# Altium PCB Thunderscope_Rev5.3.PcbDoc (part 13 of 14)
Units mil, origin at the board's own origin, x right, y up, seen from the top; angles counter-clockwise.
Board outline 3937.01 x 3838.58 mil, 6 copper layers (F.Cu, In1.Cu (GND), In2.Cu (Sign), In3.Cu (Sign), In4.Cu (GND), B.Cu), stack 60.556 mil thick; 911 components, 486 nets, 2834 pads, 2761 vias.
Unrouted connection lines stored in the file: 618.
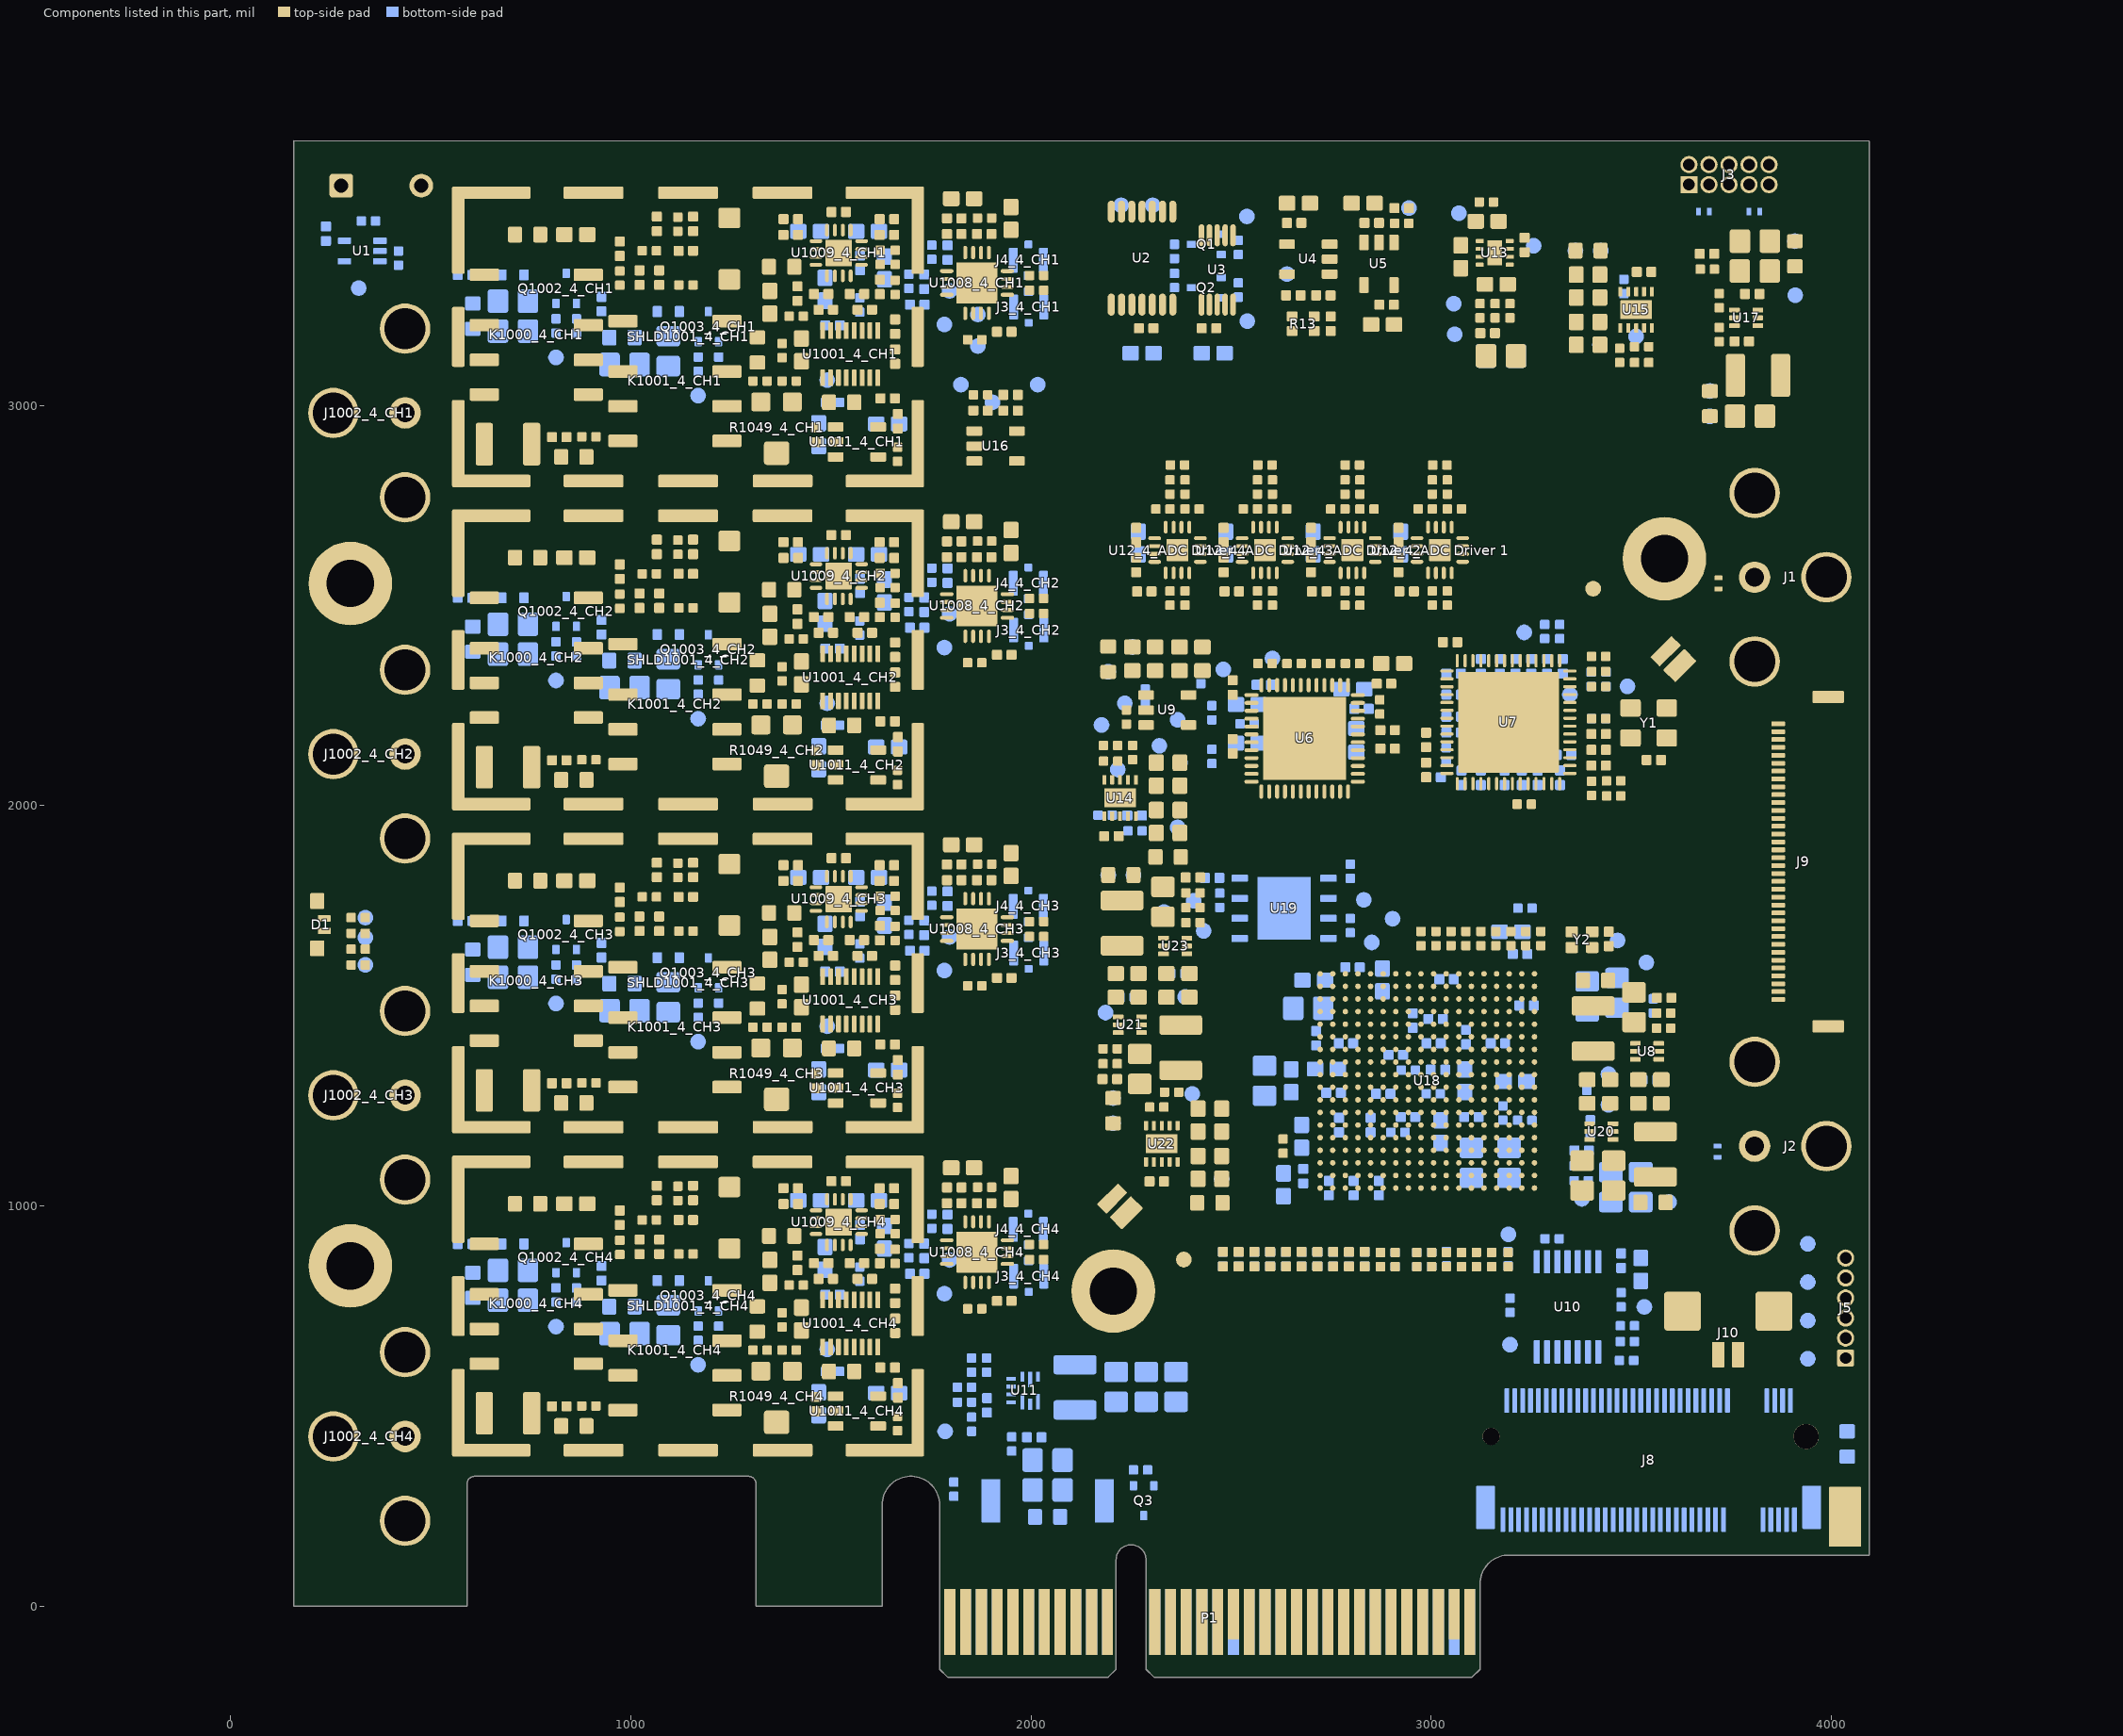
[diagram p16: the components of this part, seen from the top]

## Polygon pours and split planes (outlines as drawn) (continued)
+VUSB on B.Cu "B.Cu--86" (solid, remove dead copper, pour order 139): 2402,553.74 2402,455 2047.64,455 2047.64,483.61 2047.64,531.64 2069.74,553.74
+12V_PCIe_R on B.Cu "B.Cu--70" (solid, remove dead copper, pour order 140): 2037.4,188.98 2037.4,401.57 2007.87,401.57 2007.87,460 1973,460 1973,334.65 1868.11,334.65 1868.11,188.98 1972.44,188.98
+1V8APLL on B.Cu "B.Cu--97" (solid, remove dead copper, pour order 275): 3274.61,2353.94 3274.61,2402.95 3284.79,2402.95 3301.97,2385.78 3301.97,2353.94
+1V0 on B.Cu "B.Cu--22" (solid, remove dead copper, pour order 315): 34 vertices, not listed, extent 2849.41,1118.11 3224.41,1358.27
+3V3 on B.Cu "B.Cu--53" (solid, remove dead copper, pour order 304): 3156.5,1292.52 3156.5,1344.49 3135.83,1344.49 3135.83,1449.8 3162.4,1449.8 3162.4,1380.91 3172.24,1371.06 3201.77,1371.06 3201.77,1292.52
+3V3_ACQ on B.Cu "B.Cu--99" (solid, remove dead copper, pour order 287): 3319.34,2353.94 3296.26,2377.02 3296.26,2400.98 3315.3,2400.98 3341.34,2374.95 3341.34,2353.94
+3V3 on B.Cu "B.Cu--91" (solid, remove dead copper, pour order 284): 3269.68,1513.39 3269.68,1486.19 3279.53,1476.18 3279.53,1460.43 3243.7,1460.43 3243.7,1513.39
+1V8_ACQ on B.Cu "B.Cu--21" (solid, remove dead copper, pour order 266): 2464.57,2051.18 2360.24,2051.18 2277.56,2133.86 2277.56,2228.35 2464.57,2228.35
+1V8D on B.Cu "B.Cu--38" (solid, remove dead copper, pour order 218): 2438.98,2127.95 2438.98,2179.11 2532.26,2179.11 2532.26,2127.95
-5V on B.Cu "B.Cu--10" (solid, remove dead copper, pour order 146): 1465.75,1668.7 1465.75,1626.38 1498.77,1626.38 1509.25,1615.9 1509.25,1572.64 1550.21,1572.64 1550.2,1626.38 1550.2,1668.7
+1V0_R on B.Cu "B.Cu--25" (solid, remove dead copper, pour order 211): 3409.45,964.57 3336.61,964.57 3336.61,1151.57 3375.98,1151.57 3375.98,1043.31 3409.45,1043.31
+3V3 on B.Cu "B.Cu--26" (solid, remove dead copper, pour order 321): 3496.06,1633.86 3496.06,1532.28 3334.65,1532.28 3334.65,1586.61 3380.91,1633.86
+1V8 on B.Cu "B.Cu--31" (solid, remove dead copper, pour order 314): 2742.13,1324.8 2742.13,1369.09 2767.72,1369.09 2767.72,1323.82 2759.84,1315.94 2759.84,1297.24 2724.41,1297.24 2724.41,1250 2553.35,1250 2553.35,1324.8
+1V0 on B.Cu "B.Cu--81" (solid, remove dead copper, pour order 308): 3634.65,1036.22 3634.65,930.12 3413.58,930.12 3413.58,1036.22
+2V5 on B.Cu "B.Cu--5" (solid, remove dead copper, pour order 272): 2692.13,1582.68 2755.91,1582.68 2803.15,1582.68 2803.15,1615.16 2925.2,1615.16 2925.2,1582.68 2925.2,1537.4 2755.91,1537.4 2755.91,1424.8 2692.13,1424.8
-5V on B.Cu "B.Cu--87" (solid, remove dead copper, pour order 168): 3162.2,3093.11 3162.2,3231.82 3082.28,3231.82 3082.28,3093.11
+3V3 on B.Cu "B.Cu--79" (solid, remove dead copper, pour order 339): 3461.61,848.82 3461.61,910.81 3545.84,910.81 3545.84,848.82
+1V8 on B.Cu "B.Cu--15" (solid, remove dead copper, pour order 313): 2844.49,1369.09 2844.49,1324.21 2748.03,1324.21 2748.03,1369.09
+1V0_MGT on B.Cu "B.Cu--96" (solid, remove dead copper, pour order 309): 2910.43,1165.35 2910.43,1196.85 2844.49,1196.85 2844.49,1182.09 2788.39,1182.09 2788.39,1196.85 2751.97,1196.85 2751.97,1182.09 2657.48,1182.09 2657.48,1124.02 2756.89,1124.02 2887.8,1124.02 2887.8,1165.35
+1V0 on B.Cu "B.Cu--54" (solid, remove dead copper, pour order 307): 3064.17,1301.38 3064.17,1384.84 3127.76,1384.84 3127.76,1301.38
+1V2_MGT on B.Cu "B.Cu--33" (solid, remove dead copper, pour order 267): 2588.78,1105.51 2717.52,1105.51 2717.52,1080.31 2687.5,1080.31 2667.22,1080.31 2647.64,1061.02 2588.58,1061.02
+3V3_ACQ on B.Cu "B.Cu--41" (solid, remove dead copper, pour order 225): 2806.1,2250.05 2824.8,2230.37 2824.8,2209.65 2857.28,2209.65 2857.28,2229.33 2857.28,2331.69 2806.1,2331.69
+1V8A on B.Cu "B.Cu--66" (solid, remove dead copper, pour order 224): 2882.29,2211.81 2882.29,2174.23 2792.15,2174.23 2792.15,2211.81
+1V8A on B.Cu "B.Cu--17" (solid, remove dead copper, pour order 223): 2438.98,2234.06 2438.98,2288.37 2532.65,2288.37 2532.65,2234.06
+3V3 on B.Cu "B.Cu--79" (solid, remove dead copper, pour order 221): 3461.61,848.82 3461.61,910.81 3545.84,910.81 3545.84,848.82
+1V8D on B.Cu "B.Cu--12" (solid, remove dead copper, pour order 217): 2882.29,2164.37 2882.29,2115.18 2792.54,2115.18 2792.54,2164.37
+3V3_ACQ on B.Cu "B.Cu--93" (solid, remove dead copper, pour order 171): 2505.51,2607.28 2505.51,2658.66 2444.69,2658.66 2444.69,2623.57 2460.98,2607.28
-5V on B.Cu "B.Cu--90" (solid, remove dead copper, pour order 170): 1465.75,2475.79 1465.75,2433.46 1498.77,2433.46 1509.25,2422.98 1509.25,2379.72 1550.21,2379.72 1550.2,2433.46 1550.2,2475.79
+5V on B.Cu "B.Cu--88" (solid, remove dead copper, pour order 169): 1634.25,2217.32 1631.57,2220 1591.93,2220 1591.93,2120.87 1634.25,2120.87
+5V on B.Cu "B.Cu--85" (solid, remove dead copper, pour order 167): 1641.14,994.29 1598.82,994.29 1598.82,1028.28 1587.8,1039.36 1587.8,1078.74 1598.82,1078.74 1641.14,1078.74
+5V on B.Cu "B.Cu--84" (solid, remove dead copper, pour order 166): 1641.14,3415.55 1598.82,3415.55 1598.82,3449.54 1587.8,3460.62 1587.8,3500 1598.82,3500 1641.14,3500
+5V on B.Cu "B.Cu--82" (solid, remove dead copper, pour order 165): 1641.14,1801.38 1598.82,1801.38 1598.82,1835.37 1587.8,1846.44 1587.8,1885.83 1598.82,1885.83 1641.14,1885.83
-5V on B.Cu "B.Cu--80" (solid, remove dead copper, pour order 164): 1465.75,861.61 1465.75,819.29 1498.77,819.29 1509.25,808.81 1509.25,765.55 1550.21,765.55 1550.2,819.29 1550.2,861.61
+5V on B.Cu "B.Cu--76" (solid, remove dead copper, pour order 163): 1641.14,2608.46 1598.82,2608.46 1598.82,2642.46 1587.8,2653.53 1587.8,2692.91 1598.82,2692.91 1641.14,2692.91
-5V on B.Cu "B.Cu--74" (solid, remove dead copper, pour order 162): 1653.35,929.72 1653.35,972.05 1592.52,972.05 1587.01,966.54 1559.84,966.54 1559.84,939.96 1582.88,939.96 1592.91,929.72
-5V on B.Cu "B.Cu--72" (solid, remove dead copper, pour order 161): 1465.75,3282.87 1465.75,3240.55 1498.77,3240.55 1509.25,3230.07 1509.25,3186.81 1550.21,3186.81 1550.2,3240.55 1550.2,3282.87
-5V on B.Cu "B.Cu--71" (solid, remove dead copper, pour order 160): 1488.98,1263.39 1488.98,1305.71 1427.95,1305.71 1427.95,1263.39
-5V on B.Cu "B.Cu--67" (solid, remove dead copper, pour order 159): 1488.98,2877.56 1488.98,2919.88 1427.95,2919.88 1427.95,2877.56
-5V on B.Cu "B.Cu--63" (solid, remove dead copper, pour order 158): 1488.98,2070.47 1488.98,2112.8 1427.95,2112.8 1427.95,2070.47
+3V3_ACQ on B.Cu "B.Cu--61" (solid, remove dead copper, pour order 157): 2724.02,2607.28 2724.02,2658.66 2663.19,2658.66 2663.19,2623.57 2679.48,2607.28
-5V on B.Cu "B.Cu--59" (solid, remove dead copper, pour order 156): 1653.35,1736.81 1653.35,1779.13 1592.52,1779.13 1587.01,1773.62 1559.84,1773.62 1559.84,1747.05 1582.88,1747.05 1592.91,1736.81
+3V3_ACQ on B.Cu "B.Cu--52" (solid, remove dead copper, pour order 155): 2942.53,2607.28 2942.53,2658.66 2881.7,2658.66 2881.7,2623.57 2897.99,2607.28
+5V on B.Cu "B.Cu--46" (solid, remove dead copper, pour order 154): 1634.25,608.7 1591.93,608.7 1591.93,507.87 1634.25,507.87
-5V on B.Cu "B.Cu--40" (solid, remove dead copper, pour order 153): 1653.35,3350.98 1653.35,3393.31 1592.52,3393.31 1587.01,3387.8 1559.84,3387.8 1559.84,3361.22 1582.88,3361.22 1592.91,3350.98
+5V on B.Cu "B.Cu--37" (solid, remove dead copper, pour order 152): 1397.24,1801.38 1439.57,1801.38 1439.57,1834.4 1458.32,1853.15 1514.63,1853.15 1514.63,1885.85 1439.57,1885.83 1397.24,1885.83
+5V on B.Cu "B.Cu--32" (solid, remove dead copper, pour order 151): 1397.24,994.29 1439.57,994.29 1439.57,1027.31 1458.32,1046.06 1514.63,1046.06 1514.63,1078.76 1439.57,1078.74 1397.24,1078.74
+5V on B.Cu "B.Cu--30" (solid, remove dead copper, pour order 150): 2285.43,3111.81 2326.97,3111.81 2326.97,3207.04 2285.43,3207.04
+3V3_ACQ on B.Cu "B.Cu--27" (solid, remove dead copper, pour order 149): 2287.01,2607.28 2287.01,2658.66 2226.18,2658.66 2226.18,2623.57 2242.47,2607.28
+5V on B.Cu "B.Cu--16" (solid, remove dead copper, pour order 148): 1634.25,3025.83 1632.99,3027.09 1591.93,3027.09 1591.93,2924.02 1634.25,2924.02
-5V on B.Cu "B.Cu--13" (solid, remove dead copper, pour order 147): 1488.98,456.3 1488.98,498.62 1427.95,498.62 1427.95,456.3
+5V on B.Cu "B.Cu--9" (solid, remove dead copper, pour order 145): 1397.24,2608.46 1439.57,2608.46 1439.57,2641.49 1458.32,2660.24 1514.63,2660.24 1514.63,2692.94 1439.57,2692.91 1397.24,2692.91
+5V on B.Cu "B.Cu--8" (solid, remove dead copper, pour order 144): 1634.25,1405.12 1625.98,1413.39 1591.93,1413.39 1591.93,1311.02 1634.25,1311.02
+5V on B.Cu "B.Cu--7" (solid, remove dead copper, pour order 143): 2406.1,3111.81 2447.64,3111.81 2447.64,3208.21 2406.1,3208.21
-5V on B.Cu "B.Cu--2" (solid, remove dead copper, pour order 142): 1653.35,2543.9 1653.35,2586.22 1592.52,2586.22 1587.01,2580.71 1559.84,2580.71 1559.84,2554.13 1582.88,2554.13 1592.91,2543.9
+5V on B.Cu "B.Cu--1" (solid, remove dead copper, pour order 141): 1397.24,3415.55 1439.57,3415.55 1439.57,3448.57 1458.32,3467.32 1514.63,3467.32 1514.63,3500.02 1439.57,3500 1397.24,3500
+1V8APLL on B.Cu "B.Cu--18" (solid, remove dead copper, pour order 325): 3051.18,2132.87 3051.18,2237.2 3001.97,2237.2 3001.97,2132.87
+3V3 on B.Cu "B.Cu--11" (solid, remove dead copper, pour order 320): 2792.32,1429.13 2792.32,1384.84 2842.03,1384.84 2849.41,1377.46 2849.41,1363.19 2882.87,1363.19 2882.87,1429.13
+2V5 on B.Cu "B.Cu--89" (solid, remove dead copper, pour order 312): 2809.05,1319.88 2809.05,1269.69 2760.83,1269.69 2760.83,1319.88
+1V0 on B.Cu "B.Cu--36" (solid, remove dead copper, pour order 306): 3036.61,1419.09 3036.61,1363.19 3011.42,1363.19 3011.42,1419.09
+3V3 on B.Cu "B.Cu--44" (solid, remove dead copper, pour order 305): 3221.26,1648.43 3221.26,1588.58 3179.33,1588.58 3179.33,1648.43
+1V8 on B.Cu "B.Cu--28" (solid, remove dead copper, pour order 303): 3012.8,1480.31 3043.31,1480.31 3043.31,1453.74 3129.92,1453.74 3129.92,1427.17 3012.8,1427.17
+2V5 on B.Cu "B.Cu--43" (solid, remove dead copper, pour order 302): 2966.14,1462.99 2917.13,1462.99 2917.13,1494.09 2966.14,1494.09
+1V8APLL on B.Cu "B.Cu--19" (solid, remove dead copper, pour order 301): 3111.42,2353.94 3111.42,2402.95 3136.61,2402.95 3136.61,2353.94
+3V3_ACQ on B.Cu "B.Cu--3" (solid, remove dead copper, pour order 300): 3050.59,2317.13 3001.57,2317.13 3001.57,2349.21 3050.59,2349.21
+3V3_ACQ on B.Cu "B.Cu--77" (solid, remove dead copper, pour order 289): 3050.59,2264.96 3001.57,2264.96 3001.57,2290.16 3050.59,2290.16
+3V3_ACQ on B.Cu "B.Cu--45" (solid, remove dead copper, pour order 288): 3088.39,2064.37 3088.39,2015.35 3060.24,2015.35 3060.24,2064.37
+3V3_ACQ on B.Cu "B.Cu--35" (solid, remove dead copper, pour order 286): 3158.66,2353.94 3158.66,2402.95 3183.86,2402.95 3183.86,2353.94
+3V3_ACQ on B.Cu "B.Cu--42" (solid, remove dead copper, pour order 283): 3236.61,2353.94 3236.61,2379.72 3257.87,2400.98 3269.49,2400.98 3269.49,2363.39 3260.04,2353.94
+3V3_ACQ on B.Cu "B.Cu--69" (solid, remove dead copper, pour order 282): 3337.2,2139.57 3386.22,2139.57 3386.22,2109.25 3337.2,2109.25
+3V3_ACQ on B.Cu "B.Cu--78" (solid, remove dead copper, pour order 281): 3283.46,2064.37 3283.46,2015.35 3253.15,2015.35 3253.15,2064.37
+1V8APLL on B.Cu "B.Cu--60" (solid, remove dead copper, pour order 280): 3198.03,2353.94 3198.03,2402.95 3240.16,2402.95 3240.16,2353.94
+1V8APLL on B.Cu "B.Cu--92" (solid, remove dead copper, pour order 279): 3242.13,2064.37 3242.13,2015.35 3213.78,2015.35 3213.78,2064.37
+1V8APLL on B.Cu "B.Cu--24" (solid, remove dead copper, pour order 278): 3334.45,2064.37 3334.45,2015.35 3309.25,2015.35 3309.25,2064.37
+3V3_ACQ on B.Cu "B.Cu--34" (solid, remove dead copper, pour order 277): 3195.67,2064.37 3195.67,2015.35 3170.47,2015.35 3170.47,2064.37
+1V8APLL on B.Cu "B.Cu--49" (solid, remove dead copper, pour order 276): 3136.61,2064.37 3136.61,2015.35 3111.42,2015.35 3111.42,2064.37
+1V8_ACQ on B.Cu "B.Cu--57" (solid, remove dead copper, pour order 274): 3053.15,2031.5 3053.15,2121.06 3007.87,2121.06 3007.87,2058.07 3002.95,2053.15 2980.31,2053.15 2980.31,2031.5
+3V3 on B.Cu "B.Cu--4" (solid, remove dead copper, pour order 273): 3069.09,1579.53 3069.09,1523.62 3043.9,1523.62 3043.9,1579.53
+1V8 on B.Cu "B.Cu--47" (solid, remove dead copper, pour order 271): 2912.99,1327.95 2912.99,1418.31 2942.13,1418.31 2942.13,1327.95
+1V2_MGT on B.Cu "B.Cu--56" (solid, remove dead copper, pour order 269): 2731.5,1039.27 2844.49,1039.27 2844.49,1014.07 2731.5,1014.07
+1V2_MGT on B.Cu "B.Cu--95" (solid, remove dead copper, pour order 268): 2856.5,1075.49 2906.5,1075.49 2906.5,1050.3 2856.5,1050.3
NetC174_1 on B.Cu "B.Cu--39" (solid, remove dead copper, pour order 222): 3385.83,1159.45 3377.95,1151.57 3377.95,1045.28 3409.45,1045.28 3409.45,1192.32 3385.83,1192.32
NetC167_1 on B.Cu "B.Cu--29" (solid, remove dead copper, pour order 213): 3011.22,1353.15 3011.22,1326.77 2972.44,1326.77 2972.44,1303.15 2948.82,1303.15 2948.82,1353.35 3011.02,1353.35
AGND on B.Cu "B.Cu--75" (solid, remove dead copper, pour order 212): 2978.35,1321.36 3011.69,1321.36 3021.65,1331.32 3021.65,1353.15 3048.23,1353.15 3048.23,1330.33 3035.43,1318.52 3035.43,1269.19 3010.83,1269.19 3010.83,1295.52 3002.71,1303.64 2978.35,1303.64
PGA_BIAS_CH2 on B.Cu "B.Cu--98" (solid, remove dead copper, pour order 210): 1681.1,2506.89 1681.1,2569.88 1748.03,2569.88 1764.76,2569.88 1764.76,2549.46 1748.03,2532.48 1748.03,2506.89
PGA_BIAS_CH4 on B.Cu "B.Cu--94" (solid, remove dead copper, pour order 209): 1681.1,892.72 1681.1,955.71 1748.03,955.71 1764.76,955.71 1764.76,935.29 1748.03,918.31 1748.03,892.72
TRIM_1 on B.Cu "B.Cu--83" (solid, remove dead copper, pour order 208): 1681.1,3307.09 1710.63,3307.09 1710.63,3239.17 1681.1,3239.17
TRIM_3 on B.Cu "B.Cu--65" (solid, remove dead copper, pour order 207): 1681.1,1692.91 1710.63,1692.91 1710.63,1625 1681.1,1625
PGA_BIAS_CH1 on B.Cu "B.Cu--58" (solid, remove dead copper, pour order 206): 1681.1,3313.98 1681.1,3376.97 1748.03,3376.97 1764.76,3376.97 1764.76,3356.55 1748.03,3339.57 1748.03,3313.98
TRIM_2 on B.Cu "B.Cu--51" (solid, remove dead copper, pour order 205): 1681.1,2500 1710.63,2500 1710.63,2432.09 1681.1,2432.09
TRIM_4 on B.Cu "B.Cu--48" (solid, remove dead copper, pour order 204): 1681.1,885.83 1710.63,885.83 1710.63,817.91 1681.1,817.91
PGA_BIAS_CH3 on B.Cu "B.Cu--23" (solid, remove dead copper, pour order 203): 1681.1,1699.8 1681.1,1762.8 1748.03,1762.8 1764.76,1762.8 1764.76,1742.37 1748.03,1725.39 1748.03,1699.8
+VBIAS on B.Cu "B.Cu--73" (solid, remove dead copper, pour order 188): 1675.59,3412.79 1803.94,3412.79 1803.94,3382.48 1675.59,3382.48
+VBIAS on B.Cu "B.Cu--68" (solid, remove dead copper, pour order 187): 1675.59,991.54 1803.94,991.54 1803.94,966.14 1675.59,966.14
+VBIAS on B.Cu "B.Cu--62" (solid, remove dead copper, pour order 186): 1675.59,1798.62 1803.94,1798.62 1803.94,1773.23 1675.59,1773.23
+VBIAS on B.Cu "B.Cu--6" (solid, remove dead copper, pour order 185): 1675.59,2605.71 1803.94,2605.71 1803.94,2580.32 1675.59,2580.32
+12V_PCIe on B.Cu "B.Cu--55" (solid, remove dead copper, pour order 202): 1889.76,49.21 1889.76,76.77 1931.1,118.11 2185.04,118.11 2185.04,157.48 2216.54,188.98 2216.54,338.58 2149.61,338.58 2149.61,251.97 2043.31,251.97 2043.31,188.98 1822.83,188.98 1822.83,49.21
+VUSB_M2 on B.Cu "B.Cu--14" (solid, remove dead copper, pour order 189): 3169.29,180.93 3980.14,180.93 3996.06,196.85 3996.06,391.73 4070.87,391.73 4070.87,272.64 4070.87,131.89 3169.29,131.89
GND on B.Cu "B.Cu--20" (solid, remove dead copper, pour order 270): 3000,1293.31 3000,1240.35 2974.8,1240.35 2974.8,1293.31
+VUSB on B.Cu "+VUSB_L06_P330" (solid, remove dead copper, pour order 330): 3996,536 4071,536 4071,415.91 3996,415.91
+3V3 on B.Cu "B.Cu--50" (solid, remove dead copper, pour order 285): 3162.99,1603.15 3162.99,1554.13 3137.8,1554.13 3137.8,1603.15
GND on In3.Cu (Sign) "In3.Cu-" (solid, remove dead copper, pour order 334): 0,3641.73 4094.49,3641.73 4094.49,-255.91 0,-255.91
+3V3_PGA on In3.Cu (Sign) "In3.Cu--13" (solid, remove dead copper, pour order 192): 24 vertices, not listed, extent 193.32,287.4 1988.19,3428.61
+1V0 on In3.Cu (Sign) "In3.Cu--2" (solid, remove dead copper, pour order 327): 2853.94,1397.64 3149.61,1397.64 3503.94,1043.31 3622.05,1043.31 3622.05,885.83 3243.11,885.83 3243.11,946.91 3128.29,1061.85 2999.02,1061.97 2999.02,1126.72 2961.37,1164.37 2853.94,1164.37
+3V3_PGA on In3.Cu (Sign) "In3.Cu--6" (solid, remove dead copper, pour order 195): 1998.03,3129.92 1998.03,3277.56 2052.17,3277.56 2052.17,3139.76 2561.02,3139.76 2561.02,3435.04 2506.11,3435.04 2506.11,3194.88 2261.81,3194.88 2043.31,3413.39 1899.61,3413.39 1899.61,3188.98 1899.61,3129.92
+VBIAS on In3.Cu (Sign) "In3.Cu--5" (solid, remove dead copper, pour order 196): 1785.72,3431.72 1909.92,3431.72 1965.4,3487.2 2603.35,3487.2 2603.35,3314.89 2669.29,3314.89 2669.29,3527.56 2648.62,3548.23 1674.24,3548.23 1674.24,954.72 1702.76,954.72 1702.76,3348.76
-5V on In3.Cu (Sign) "In3.Cu--12" (solid, remove dead copper, pour order 243): 3129.91,3151.05 3150.04,3151.05 3150.04,3098.43 2692.91,3098.43 2692.91,3523.62 2663.39,3553.15 1669.29,3553.15 1669.29,408.46 1399.61,408.46 1399.61,3641.73 3129.93,3641.73
VCM on In3.Cu (Sign) "In3.Cu--9" (solid, remove dead copper, pour order 324): 2191.93,2551.18 2191.93,2334.65 2448.82,2334.65 2448.82,2480.32 2992.13,2480.32 2992.13,2551.18
+3V3_ACQ on In3.Cu (Sign) "In3.Cu--7" (solid, remove dead copper, pour order 190): 19 vertices, not listed, extent 2191.93,2440.94 3133.86,2720.47
+3V3_PGA on In3.Cu (Sign) "In3.Cu--11" (solid, remove dead copper, pour order 193): 1899.61,3120.08 1921.26,3098.43 1921.26,2409.45 1899.61,2387.8 1899.61,2338.58 1988.19,2338.58 1988.19,3203.74 1899.61,3203.74
VCM on In3.Cu (Sign) "In3.Cu--3" (solid, remove dead copper, pour order 191): 23 vertices, not listed, extent 1968.5,724.41 2580,3277.56
+3V3_PGA on In3.Cu (Sign) "In3.Cu--8" (solid, remove dead copper, pour order 194): 1899.61,2312.99 1921.26,2291.34 1921.26,1602.36 1899.61,1580.71 1899.61,1531.5 1988.19,1531.5 1988.19,2362.2 1899.61,2362.2
+1V8D on In3.Cu (Sign) "In3.Cu--4" (solid, remove dead copper, pour order 245): 2885.17,2200.79 2449.8,2200.79 2449.8,2007.87 2761.81,2007.87 2885.17,2131.23
+3V3_ACQ on In3.Cu (Sign) "In3.Cu--10" (solid, remove dead copper, pour order 311): 2866.14,2206.69 2580.71,2206.69 2580.71,2360.24 2410,2360.24 2410,2477.36 3344.49,2477.36 3484.25,2337.6 3484.25,2007.87 3059.05,2007.87 3059.05,2051.18 3035.43,2074.8 2895.67,2074.8 2866.14,2104.33
+1V0_MGT on In3.Cu (Sign) "In3.Cu--1" (solid, remove dead copper, pour order 329): 2755.91,1169.29 2874.02,1169.29 2874.02,1141.73 2755.91,1141.73
+VUSB on In2.Cu (Sign) "In2.Cu--8" (solid, remove dead copper, pour order 331): 27 vertices, not listed, extent 305.12,255.91 4094.49,3641.73
+5V on In2.Cu (Sign) "In2.Cu--2" (solid, remove dead copper, pour order 319): 1787,645.47 1787,408.46 1399.61,408.46 1399.61,3641.73 2056.68,3641.73 3490,3641.73 3490,3055.12 2056.68,3055.12 2056.68,645.47
GND on In2.Cu (Sign) "In2.Cu--11" (solid, remove dead copper, pour order 335): -0.98,330.71 -0.98,3641.73 1395.09,3641.73 1394.88,407.48 1790.35,407.48 1790.35,336.61 1703.74,336.61 1703.74,19.69 -0.98,19.69
+3V3 on In2.Cu (Sign) "In2.Cu--3" (solid, remove dead copper, pour order 317): 18 vertices, not listed, extent 2322.07,866.14 3680,1988.19
-VBIAS on In2.Cu (Sign) "In2.Cu--7" (solid, remove dead copper, pour order 318): 1638.58,3582.68 1704.72,3582.68 2972.44,3582.68 2972.44,3480.86 2921.26,3480.86 2921.26,3543.31 2909.45,3555.12 1704.72,3555.12 1704.72,787.4 1638.58,787.4
GND on In2.Cu (Sign) "In2.Cu-" (solid, remove dead copper, pour order 333): 1704.72,324.8 4094.49,324.8 4094.49,-255.91 1704.72,-255.91
+1V8 on In2.Cu (Sign) "In2.Cu--10" (solid, remove dead copper, pour order 316): 23 vertices, not listed, extent 2145.67,962.6 3125.98,1447.87
+1V8APLL on In2.Cu (Sign) "In2.Cu--1" (solid, remove dead copper, pour order 263): 2905.51,2405.51 3582.68,2405.51 3582.68,1996.06 2905.51,1996.06
+2V5 on In2.Cu (Sign) "In2.Cu--6" (solid, remove dead copper, pour order 264): 21 vertices, not listed, extent 2145.67,1259.84 2947.48,1988.19
+1V2_MGT on In2.Cu (Sign) "In2.Cu--4" (solid, remove dead copper, pour order 265): 2917.32,1011.81 2440.94,1011.81 2370.08,1082.68 2370.08,1295.28 2540.35,1295.28 2540.35,1114.17 2917.32,1114.17
+1V8_ACQ on In2.Cu (Sign) "In2.Cu--9" (solid, pour order 138): 2341.76,1996.06 2341.76,2177.17 2996.06,2177.17 2996.06,2153.54 3059.05,2153.54 3059.05,1996.06
+1V8A on In2.Cu (Sign) "In2.Cu--5" (solid, remove dead copper, pour order 137): 2905.51,2405.51 2905.51,2181.1 2464.57,2181.1 2464.57,2405.51
GND on In1.Cu (GND) "In1.Cu-" (solid, remove dead copper, pour order 332): 0,3641.73 4094.49,3641.73 4094.49,-255.91 0,-255.91
GND on In4.Cu (GND) "In4.Cu-" (solid, remove dead copper, pour order 336): 0,3641.73 4094.49,3641.73 4094.49,-255.91 0,-255.91

## Keep-outs
F.Cu:
  circle w39.37: c3404.53,2542.32 r19.68
  circle w39.37: c2381.89,866.14 r19.68
  rectangle: 3637.2,2029.44 3740.04,2123.74
  rectangle: 3740.16,1507.87 3851.87,2212.6
  region: 1772.76,239.09 589.53,239.09 589.53,366.16 1772.76,366.16
  region: 2616.99,2727.16 2552.03,2727.16 2552.03,2865.35 2616.99,2865.35
  region: 2398.49,2727.16 2333.53,2727.16 2333.53,2865.35 2398.49,2865.35
  region: 3054.01,2727.16 2989.05,2727.16 2989.05,2865.35 3054.01,2865.35
  region: 2433.86,2727.16 2297.64,2727.16 2297.64,2755.14 2433.86,2755.14
  region: 2835.5,2727.16 2770.54,2727.16 2770.54,2865.35 2835.5,2865.35
  region: 3089.38,2727.16 2953.16,2727.16 2953.16,2755.14 3089.38,2755.14
  region: 2652.36,2727.16 2516.15,2727.16 2516.15,2755.14 2652.36,2755.14
  region: 2870.87,2727.16 2734.65,2727.16 2734.65,2755.14 2870.87,2755.14
  region: 1627.95,4.92 1312.99,4.92 1312.99,135.83 1627.95,135.83
  region: 2925.2,2083.42 2925.2,1267.72 2507.87,1267.72 2507.87,1302.36 2440.94,1302.36 2440.94,2064.96 2475.39,2099.41 2909.2,2099.41
  region: 2833.66,2321.85 2833.66,2016.74 2534.18,2016.74 2534.18,2321.85
  region: 3437.99,2061.02 3400.59,2061.02 3400.59,2100.39 3400.59,2375.59 3434.83,2375.59
  region: 2884.84,795.28 2539.37,795.28 2539.37,866.56 2614.15,941.34 2884.84,941.34
  region: 3804.68,1625.98 2926.18,1625.98 2926.18,2028.54 3804.68,2028.54
  region: 3362.75,2379.13 3362.75,2038.77 3023.9,2038.77 3023.9,2379.13
  region: 3305.12,997.54 2675.2,997.54 2675.2,1627.46 3305.12,1627.46
  lines w10: 3670.38,1555.05 3712.23,1513.2 3746.64,1513.2
In1.Cu (GND):
  region: 1772.76,239.09 589.53,239.09 589.53,366.16 1772.76,366.16
  region: 1035.63,473.62 960.63,473.62 960.63,506.69 1035.63,506.69
  region: 1036.24,865.35 1007.08,865.35 1007.08,930.71 1036.24,930.71
  region: 692.91,2274.31 617.91,2274.31 617.91,2307.38 692.91,2307.38
  region: 906.32,2101.97 845.67,2101.97 845.67,2127.56 906.32,2127.56
  region: 1079.54,3421.06 1050.39,3421.06 1050.39,3450.2 1079.54,3450.2
  region: 1269.49,2261.02 1194.49,2261.02 1194.49,2294.09 1269.49,2294.09
  region: 906.32,1294.88 845.67,1294.88 845.67,1320.47 906.32,1320.47
  region: 692.91,3168.01 617.91,3168.01 617.91,3201.08 692.91,3201.08
  region: 692.91,573.52 617.91,573.52 617.91,606.59 692.91,606.59
  region: 1170.08,2564.76 1104.72,2564.76 1104.72,2593.91 1170.08,2593.91
  region: 1077.76,3400.2 1077.76,3372.64 1014.78,3372.64 1014.78,3400.2
  region: 986.22,865.16 958.66,865.16 958.66,928.13 986.22,928.13
  region: 792.72,969.88 691.93,969.88 691.93,1011.61 792.72,1011.61
  region: 1036.24,1672.44 1007.08,1672.44 1007.08,1737.8 1036.24,1737.8
  region: 987.02,937.8 957.87,937.8 957.87,966.93 987.02,966.93
  region: 692.91,2994.78 617.91,2994.78 617.91,3027.85 692.91,3027.85
  region: 1364.96,903.74 1325.98,903.74 1325.98,946.66 1364.96,946.66
  region: 1269.49,1367.32 1194.49,1367.32 1194.49,1400.39 1269.49,1400.39
  region: 986.22,1672.24 958.66,1672.24 958.66,1735.22 986.22,1735.22
  region: 888.57,2851.08 788.57,2851.08 788.57,2892.03 888.57,2892.03
  region: 1169.29,3314.96 1169.29,3287.4 1106.32,3287.4 1106.32,3314.96
  region: 1085.45,865.35 1056.29,865.35 1056.29,930.71 1085.45,930.71
  region: 926.77,1380.61 851.77,1380.61 851.77,1413.68 926.77,1413.68
  region: 833.85,486.02 770.67,486.02 770.67,513.19 833.85,513.19
  region: 1269.49,1453.94 1194.49,1453.94 1194.49,1487.01 1269.49,1487.01
  region: 1035.63,2174.41 960.63,2174.41 960.63,2207.48 1035.63,2207.48
  region: 757.68,479.79 667.52,479.79 667.52,511.37 757.68,511.37
  region: 757.68,2093.96 667.52,2093.96 667.52,2125.54 757.68,2125.54
  region: 1035.63,560.24 960.63,560.24 960.63,593.31 1035.63,593.31
  region: 1131.11,1807.09 1103.54,1807.09 1103.54,1834.65 1131.11,1834.65
  region: 792.72,2584.05 691.93,2584.05 691.93,2625.79 792.72,2625.79
  region: 1318.11,626.87 1292.33,626.87 1292.33,652.46 1318.11,652.46
  region: 852.17,970.18 813.19,970.18 813.19,1013.1 852.17,1013.1
  region: 1035.63,3068.11 960.63,3068.11 960.63,3101.18 1035.63,3101.18
  region: 1035.63,1367.32 960.63,1367.32 960.63,1400.39 1035.63,1400.39
  region: 1035.63,1280.71 960.63,1280.71 960.63,1313.78 1035.63,1313.78
  region: 1269.49,1280.71 1194.49,1280.71 1194.49,1313.78 1269.49,1313.78
  region: 1085.45,2479.53 1056.29,2479.53 1056.29,2544.89 1085.45,2544.89
  region: 757.68,2901.05 667.52,2901.05 667.52,2932.63 757.68,2932.63
  region: 926.77,573.52 851.77,573.52 851.77,606.59 926.77,606.59
  region: 888.57,429.82 788.57,429.82 788.57,470.77 888.57,470.77
  region: 1366.93,786.22 1327.95,786.22 1327.95,887.01 1366.93,887.01
  region: 852.17,1777.27 813.19,1777.27 813.19,1820.18 852.17,1820.18
  region: 692.91,746.75 617.91,746.75 617.91,779.82 692.91,779.82
  region: 757.68,1286.87 667.52,1286.87 667.52,1318.46 757.68,1318.46
  region: 926.77,746.75 851.77,746.75 851.77,779.82 926.77,779.82
  region: 1364.96,3325 1325.98,3325 1325.98,3367.92 1364.96,3367.92
  region: 1170.08,950.58 1104.72,950.58 1104.72,979.74 1170.08,979.74
  region: 1085.45,3286.61 1056.29,3286.61 1056.29,3351.97 1085.45,3351.97
  region: 906.32,487.8 845.67,487.8 845.67,513.39 906.32,513.39
  region: 1035.63,646.85 960.63,646.85 960.63,679.92 1035.63,679.92
  region: 926.77,3168.01 851.77,3168.01 851.77,3201.08 926.77,3201.08
  region: 926.77,1553.84 851.77,1553.84 851.77,1586.91 926.77,1586.91
  region: 833.85,2907.28 770.67,2907.28 770.67,2934.45 833.85,2934.45
  region: 692.91,1553.84 617.91,1553.84 617.91,1586.91 692.91,1586.91
  region: 1035.63,2894.88 960.63,2894.88 960.63,2927.95 1035.63,2927.95
  region: 1131.11,1000 1103.54,1000 1103.54,1027.57 1131.11,1027.57
  region: 1366.93,2400.39 1327.95,2400.39 1327.95,2501.19 1366.93,2501.19
  region: 1169.29,2480.32 1106.32,2480.32 1106.32,2507.87 1169.29,2507.87
  region: 1364.96,1710.83 1325.98,1710.83 1325.98,1753.75 1364.96,1753.75
  region: 1269.49,646.85 1194.49,646.85 1194.49,679.92 1269.49,679.92
  region: 1275.59,3440.94 1216.54,3440.94 1216.54,3496.06 1275.59,3496.06
  region: 692.91,1467.22 617.91,1467.22 617.91,1500.3 692.91,1500.3
  region: 1035.63,2981.5 960.63,2981.5 960.63,3014.57 1035.63,3014.57
  region: 1336.71,667.32 1294.98,667.32 1294.98,768.11 1336.71,768.11
  region: 906.32,2909.06 845.67,2909.06 845.67,2934.65 906.32,2934.65
  region: 792.72,1776.97 691.93,1776.97 691.93,1818.7 792.72,1818.7
  region: 1035.63,2087.8 960.63,2087.8 960.63,2120.87 1035.63,2120.87
  region: 1036.24,2479.53 1007.08,2479.53 1007.08,2544.89 1036.24,2544.89
  region: 692.91,660.14 617.91,660.14 617.91,693.21 692.91,693.21
  region: 987.02,1744.88 957.87,1744.88 957.87,1774.02 987.02,1774.02
  region: 1170.1,1806.89 1140.94,1806.89 1140.94,1836.02 1170.1,1836.02
  region: 1269.49,473.62 1194.49,473.62 1194.49,506.69 1269.49,506.69
  region: 1269.49,3068.11 1194.49,3068.11 1194.49,3101.18 1269.49,3101.18
  region: 1077.76,1786.02 1077.76,1758.46 1014.78,1758.46 1014.78,1786.02
  region: 1275.59,2633.86 1216.54,2633.86 1216.54,2688.98 1275.59,2688.98
  region: 986.22,2479.33 958.66,2479.33 958.66,2542.3 986.22,2542.3
  region: 1035.63,2261.02 960.63,2261.02 960.63,2294.09 1035.63,2294.09
  region: 1269.49,560.24 1194.49,560.24 1194.49,593.31 1269.49,593.31
  region: 1269.49,2894.88 1194.49,2894.88 1194.49,2927.95 1269.49,2927.95
  region: 1085.45,1672.44 1056.29,1672.44 1056.29,1737.8 1085.45,1737.8
  region: 1131.11,3421.26 1103.54,3421.26 1103.54,3448.83 1131.11,3448.83
  region: 1318.11,2241.04 1292.33,2241.04 1292.33,2266.63 1318.11,2266.63
  region: 926.77,2274.31 851.77,2274.31 851.77,2307.38 926.77,2307.38
  region: 1079.54,1806.89 1050.39,1806.89 1050.39,1836.02 1079.54,1836.02
  region: 833.85,1293.11 770.67,1293.11 770.67,1320.28 833.85,1320.28
  region: 1275.59,1826.77 1216.54,1826.77 1216.54,1881.89 1275.59,1881.89
  region: 1336.71,1474.41 1294.98,1474.41 1294.98,1575.2 1336.71,1575.2
  region: 926.77,2360.93 851.77,2360.93 851.77,2394 926.77,2394
  region: 1169.29,1673.23 1106.32,1673.23 1106.32,1700.79 1169.29,1700.79
  region: 692.91,3081.4 617.91,3081.4 617.91,3114.47 692.91,3114.47
  region: 926.77,2994.78 851.77,2994.78 851.77,3027.85 926.77,3027.85
  region: 1366.93,1593.31 1327.95,1593.31 1327.95,1694.1 1366.93,1694.1
  region: 1170.08,3371.84 1104.72,3371.84 1104.72,3401 1170.08,3401
  region: 888.57,2043.99 788.57,2043.99 788.57,2084.94 888.57,2084.94
  region: 1035.63,1453.94 960.63,1453.94 960.63,1487.01 1035.63,1487.01
  region: 1366.93,3207.48 1327.95,3207.48 1327.95,3308.27 1366.93,3308.27
  region: 1318.11,1433.96 1292.33,1433.96 1292.33,1459.55 1318.11,1459.55
  region: 1364.96,2517.91 1325.98,2517.91 1325.98,2560.83 1364.96,2560.83
  region: 692.91,1380.61 617.91,1380.61 617.91,1413.68 692.91,1413.68
  region: 1079.54,999.8 1050.39,999.8 1050.39,1028.94 1079.54,1028.94
  region: 1131.11,2614.18 1103.54,2614.18 1103.54,2641.74 1131.11,2641.74
  region: 1079.54,2613.98 1050.39,2613.98 1050.39,2643.11 1079.54,2643.11
  region: 1077.76,2593.11 1077.76,2565.55 1014.78,2565.55 1014.78,2593.11
  region: 1170.1,3421.06 1140.94,3421.06 1140.94,3450.2 1170.1,3450.2
  region: 986.22,3286.42 958.66,3286.42 958.66,3349.39 986.22,3349.39
  region: 1170.1,999.8 1140.94,999.8 1140.94,1028.94 1170.1,1028.94
  region: 1336.71,3088.58 1294.98,3088.58 1294.98,3189.37 1336.71,3189.37
  region: 926.77,3081.4 851.77,3081.4 851.77,3114.47 926.77,3114.47
  region: 926.77,660.14 851.77,660.14 851.77,693.21 926.77,693.21
  region: 1269.49,2087.8 1194.49,2087.8 1194.49,2120.87 1269.49,2120.87
  region: 888.57,1236.91 788.57,1236.91 788.57,1277.85 888.57,1277.85
  region: 1170.1,2613.98 1140.94,2613.98 1140.94,2643.11 1170.1,2643.11
  region: 833.85,2100.2 770.67,2100.2 770.67,2127.36 833.85,2127.36
  region: 852.17,3391.44 813.19,3391.44 813.19,3434.36 852.17,3434.36
  region: 987.02,2551.97 957.87,2551.97 957.87,2581.1 987.02,2581.1
  region: 1318.11,3048.13 1292.33,3048.13 1292.33,3073.72 1318.11,3073.72
  region: 1169.29,866.14 1106.32,866.14 1106.32,893.7 1169.29,893.7
  region: 1077.76,951.38 1014.78,951.38 1014.78,978.94 1077.76,978.94
  region: 792.72,3391.14 691.93,3391.14 691.93,3432.87 792.72,3432.87
  region: 1269.49,2981.5 1194.49,2981.5 1194.49,3014.57 1269.49,3014.57
  region: 692.91,2360.93 617.91,2360.93 617.91,2394 692.91,2394
  region: 1036.24,3286.61 1007.08,3286.61 1007.08,3351.97 1036.24,3351.97
  region: 852.17,2584.35 813.19,2584.35 813.19,2627.27 852.17,2627.27
  region: 1275.59,1019.69 1216.54,1019.69 1216.54,1074.8 1275.59,1074.8
  region: 692.91,2187.7 617.91,2187.7 617.91,2220.77 692.91,2220.77
  region: 926.77,2187.7 851.77,2187.7 851.77,2220.77 926.77,2220.77
  region: 987.02,3359.06 957.87,3359.06 957.87,3388.19 987.02,3388.19
  region: 926.77,1467.22 851.77,1467.22 851.77,1500.3 926.77,1500.3
  region: 1269.49,2174.41 1194.49,2174.41 1194.49,2207.48 1269.49,2207.48
  region: 1336.71,2281.5 1294.98,2281.5 1294.98,2382.28 1336.71,2382.28
  region: 1170.08,1757.67 1104.72,1757.67 1104.72,1786.83 1170.08,1786.83
  region: 3122.05,-177.17 1771.65,-177.17 1771.65,43.31 3122.05,43.31
  region: 2616.99,2727.16 2552.03,2727.16 2552.03,2865.35 2616.99,2865.35
  region: 2398.49,2727.16 2333.53,2727.16 2333.53,2865.35 2398.49,2865.35
  region: 3054.01,2727.16 2989.05,2727.16 2989.05,2865.35 3054.01,2865.35
  region: 2433.86,2727.16 2297.64,2727.16 2297.64,2755.14 2433.86,2755.14
  region: 2835.5,2727.16 2770.54,2727.16 2770.54,2865.35 2835.5,2865.35
  region: 3089.38,2727.16 2953.16,2727.16 2953.16,2755.14 3089.38,2755.14
  region: 2652.36,2727.16 2516.15,2727.16 2516.15,2755.14 2652.36,2755.14
  region: 2870.87,2727.16 2734.65,2727.16 2734.65,2755.14 2870.87,2755.14
  region: 3122.05,-177.17 1771.65,-177.17 1771.65,43.31 3122.05,43.31
In2.Cu (Sign):
  region: 1772.76,239.09 590.55,239.09 590.55,324.8 1772.76,324.8
  region: 3122.05,-177.17 1771.65,-177.17 1771.65,43.31 3122.05,43.31
  region: 1035.63,473.62 960.63,473.62 960.63,506.69 1035.63,506.69
  region: 1036.24,865.35 1007.08,865.35 1007.08,930.71 1036.24,930.71
  region: 692.91,2274.31 617.91,2274.31 617.91,2307.38 692.91,2307.38
  region: 906.32,2101.97 845.67,2101.97 845.67,2127.56 906.32,2127.56
  region: 1079.54,3421.06 1050.39,3421.06 1050.39,3450.2 1079.54,3450.2
  region: 1269.49,2261.02 1194.49,2261.02 1194.49,2294.09 1269.49,2294.09
  region: 906.32,1294.88 845.67,1294.88 845.67,1320.47 906.32,1320.47
  region: 692.91,3168.01 617.91,3168.01 617.91,3201.08 692.91,3201.08
  region: 692.91,573.52 617.91,573.52 617.91,606.59 692.91,606.59
  region: 1170.08,2564.76 1104.72,2564.76 1104.72,2593.91 1170.08,2593.91
  region: 1077.76,3400.2 1077.76,3372.64 1014.78,3372.64 1014.78,3400.2
  region: 986.22,865.16 958.66,865.16 958.66,928.13 986.22,928.13
  region: 792.72,969.88 691.93,969.88 691.93,1011.61 792.72,1011.61
  region: 1036.24,1672.44 1007.08,1672.44 1007.08,1737.8 1036.24,1737.8
  region: 987.02,937.8 957.87,937.8 957.87,966.93 987.02,966.93
  region: 692.91,2994.78 617.91,2994.78 617.91,3027.85 692.91,3027.85
  region: 1364.96,903.74 1325.98,903.74 1325.98,946.66 1364.96,946.66
  region: 1269.49,1367.32 1194.49,1367.32 1194.49,1400.39 1269.49,1400.39
  region: 986.22,1672.24 958.66,1672.24 958.66,1735.22 986.22,1735.22
  region: 888.57,2851.08 788.57,2851.08 788.57,2892.03 888.57,2892.03
  region: 1169.29,3314.96 1169.29,3287.4 1106.32,3287.4 1106.32,3314.96
  region: 1085.45,865.35 1056.29,865.35 1056.29,930.71 1085.45,930.71
  region: 926.77,1380.61 851.77,1380.61 851.77,1413.68 926.77,1413.68
  region: 833.85,486.02 770.67,486.02 770.67,513.19 833.85,513.19
  region: 1269.49,1453.94 1194.49,1453.94 1194.49,1487.01 1269.49,1487.01
  region: 1035.63,2174.41 960.63,2174.41 960.63,2207.48 1035.63,2207.48
  region: 757.68,479.79 667.52,479.79 667.52,511.37 757.68,511.37
  region: 757.68,2093.96 667.52,2093.96 667.52,2125.54 757.68,2125.54
  region: 1035.63,560.24 960.63,560.24 960.63,593.31 1035.63,593.31
  region: 1131.11,1807.09 1103.54,1807.09 1103.54,1834.65 1131.11,1834.65
  region: 792.72,2584.05 691.93,2584.05 691.93,2625.79 792.72,2625.79
  region: 1318.11,626.87 1292.33,626.87 1292.33,652.46 1318.11,652.46
  region: 852.17,970.18 813.19,970.18 813.19,1013.1 852.17,1013.1
  region: 1035.63,3068.11 960.63,3068.11 960.63,3101.18 1035.63,3101.18
  region: 1035.63,1367.32 960.63,1367.32 960.63,1400.39 1035.63,1400.39
  region: 1035.63,1280.71 960.63,1280.71 960.63,1313.78 1035.63,1313.78
  region: 1269.49,1280.71 1194.49,1280.71 1194.49,1313.78 1269.49,1313.78
  region: 1085.45,2479.53 1056.29,2479.53 1056.29,2544.89 1085.45,2544.89
  region: 757.68,2901.05 667.52,2901.05 667.52,2932.63 757.68,2932.63
  region: 926.77,573.52 851.77,573.52 851.77,606.59 926.77,606.59
  region: 888.57,429.82 788.57,429.82 788.57,470.77 888.57,470.77
  region: 1366.93,786.22 1327.95,786.22 1327.95,887.01 1366.93,887.01
  region: 852.17,1777.27 813.19,1777.27 813.19,1820.18 852.17,1820.18
  region: 692.91,746.75 617.91,746.75 617.91,779.82 692.91,779.82
  region: 757.68,1286.87 667.52,1286.87 667.52,1318.46 757.68,1318.46
  region: 926.77,746.75 851.77,746.75 851.77,779.82 926.77,779.82
  region: 1364.96,3325 1325.98,3325 1325.98,3367.92 1364.96,3367.92
  region: 1170.08,950.58 1104.72,950.58 1104.72,979.74 1170.08,979.74
  region: 1085.45,3286.61 1056.29,3286.61 1056.29,3351.97 1085.45,3351.97
  region: 906.32,487.8 845.67,487.8 845.67,513.39 906.32,513.39
  region: 1035.63,646.85 960.63,646.85 960.63,679.92 1035.63,679.92
  region: 926.77,3168.01 851.77,3168.01 851.77,3201.08 926.77,3201.08
  region: 926.77,1553.84 851.77,1553.84 851.77,1586.91 926.77,1586.91
  region: 833.85,2907.28 770.67,2907.28 770.67,2934.45 833.85,2934.45
  region: 692.91,1553.84 617.91,1553.84 617.91,1586.91 692.91,1586.91
  region: 1035.63,2894.88 960.63,2894.88 960.63,2927.95 1035.63,2927.95
  region: 1131.11,1000 1103.54,1000 1103.54,1027.57 1131.11,1027.57
  region: 1366.93,2400.39 1327.95,2400.39 1327.95,2501.19 1366.93,2501.19
  region: 1169.29,2480.32 1106.32,2480.32 1106.32,2507.87 1169.29,2507.87
  region: 1364.96,1710.83 1325.98,1710.83 1325.98,1753.75 1364.96,1753.75
  region: 1269.49,646.85 1194.49,646.85 1194.49,679.92 1269.49,679.92
  region: 1275.59,3440.94 1216.54,3440.94 1216.54,3496.06 1275.59,3496.06
  region: 692.91,1467.22 617.91,1467.22 617.91,1500.3 692.91,1500.3
  region: 1035.63,2981.5 960.63,2981.5 960.63,3014.57 1035.63,3014.57
  region: 1336.71,667.32 1294.98,667.32 1294.98,768.11 1336.71,768.11
  region: 906.32,2909.06 845.67,2909.06 845.67,2934.65 906.32,2934.65
  region: 792.72,1776.97 691.93,1776.97 691.93,1818.7 792.72,1818.7
  region: 1035.63,2087.8 960.63,2087.8 960.63,2120.87 1035.63,2120.87
  region: 1036.24,2479.53 1007.08,2479.53 1007.08,2544.89 1036.24,2544.89
  region: 692.91,660.14 617.91,660.14 617.91,693.21 692.91,693.21
  region: 987.02,1744.88 957.87,1744.88 957.87,1774.02 987.02,1774.02
  region: 1170.1,1806.89 1140.94,1806.89 1140.94,1836.02 1170.1,1836.02
  region: 1269.49,473.62 1194.49,473.62 1194.49,506.69 1269.49,506.69
  region: 1269.49,3068.11 1194.49,3068.11 1194.49,3101.18 1269.49,3101.18
  region: 1077.76,1786.02 1077.76,1758.46 1014.78,1758.46 1014.78,1786.02
  region: 1275.59,2633.86 1216.54,2633.86 1216.54,2688.98 1275.59,2688.98
  region: 986.22,2479.33 958.66,2479.33 958.66,2542.3 986.22,2542.3
  region: 1035.63,2261.02 960.63,2261.02 960.63,2294.09 1035.63,2294.09
  region: 1269.49,560.24 1194.49,560.24 1194.49,593.31 1269.49,593.31
  region: 1269.49,2894.88 1194.49,2894.88 1194.49,2927.95 1269.49,2927.95
  region: 1085.45,1672.44 1056.29,1672.44 1056.29,1737.8 1085.45,1737.8
  region: 1131.11,3421.26 1103.54,3421.26 1103.54,3448.83 1131.11,3448.83
  region: 1318.11,2241.04 1292.33,2241.04 1292.33,2266.63 1318.11,2266.63
  region: 926.77,2274.31 851.77,2274.31 851.77,2307.38 926.77,2307.38
  region: 1079.54,1806.89 1050.39,1806.89 1050.39,1836.02 1079.54,1836.02
  region: 833.85,1293.11 770.67,1293.11 770.67,1320.28 833.85,1320.28
  region: 1275.59,1826.77 1216.54,1826.77 1216.54,1881.89 1275.59,1881.89
  region: 1336.71,1474.41 1294.98,1474.41 1294.98,1575.2 1336.71,1575.2
  region: 926.77,2360.93 851.77,2360.93 851.77,2394 926.77,2394
  region: 1169.29,1673.23 1106.32,1673.23 1106.32,1700.79 1169.29,1700.79
  region: 692.91,3081.4 617.91,3081.4 617.91,3114.47 692.91,3114.47
  region: 926.77,2994.78 851.77,2994.78 851.77,3027.85 926.77,3027.85
  region: 1366.93,1593.31 1327.95,1593.31 1327.95,1694.1 1366.93,1694.1
  region: 1170.08,3371.84 1104.72,3371.84 1104.72,3401 1170.08,3401
  region: 888.57,2043.99 788.57,2043.99 788.57,2084.94 888.57,2084.94
  region: 1035.63,1453.94 960.63,1453.94 960.63,1487.01 1035.63,1487.01
  region: 1366.93,3207.48 1327.95,3207.48 1327.95,3308.27 1366.93,3308.27
  region: 1318.11,1433.96 1292.33,1433.96 1292.33,1459.55 1318.11,1459.55
  region: 1364.96,2517.91 1325.98,2517.91 1325.98,2560.83 1364.96,2560.83
  region: 692.91,1380.61 617.91,1380.61 617.91,1413.68 692.91,1413.68
  region: 1079.54,999.8 1050.39,999.8 1050.39,1028.94 1079.54,1028.94
  region: 1131.11,2614.18 1103.54,2614.18 1103.54,2641.74 1131.11,2641.74
  region: 1079.54,2613.98 1050.39,2613.98 1050.39,2643.11 1079.54,2643.11
  region: 1077.76,2593.11 1077.76,2565.55 1014.78,2565.55 1014.78,2593.11
  region: 1170.1,3421.06 1140.94,3421.06 1140.94,3450.2 1170.1,3450.2
  region: 986.22,3286.42 958.66,3286.42 958.66,3349.39 986.22,3349.39
  region: 1170.1,999.8 1140.94,999.8 1140.94,1028.94 1170.1,1028.94
  region: 1336.71,3088.58 1294.98,3088.58 1294.98,3189.37 1336.71,3189.37
  region: 926.77,3081.4 851.77,3081.4 851.77,3114.47 926.77,3114.47
  region: 926.77,660.14 851.77,660.14 851.77,693.21 926.77,693.21
  region: 1269.49,2087.8 1194.49,2087.8 1194.49,2120.87 1269.49,2120.87
  region: 888.57,1236.91 788.57,1236.91 788.57,1277.85 888.57,1277.85
  region: 1170.1,2613.98 1140.94,2613.98 1140.94,2643.11 1170.1,2643.11
  region: 833.85,2100.2 770.67,2100.2 770.67,2127.36 833.85,2127.36
  region: 852.17,3391.44 813.19,3391.44 813.19,3434.36 852.17,3434.36
  region: 987.02,2551.97 957.87,2551.97 957.87,2581.1 987.02,2581.1
  region: 1318.11,3048.13 1292.33,3048.13 1292.33,3073.72 1318.11,3073.72
  region: 1169.29,866.14 1106.32,866.14 1106.32,893.7 1169.29,893.7
  region: 1077.76,951.38 1014.78,951.38 1014.78,978.94 1077.76,978.94
  region: 792.72,3391.14 691.93,3391.14 691.93,3432.87 792.72,3432.87
  region: 1269.49,2981.5 1194.49,2981.5 1194.49,3014.57 1269.49,3014.57
  region: 692.91,2360.93 617.91,2360.93 617.91,2394 692.91,2394
  region: 1036.24,3286.61 1007.08,3286.61 1007.08,3351.97 1036.24,3351.97
  region: 852.17,2584.35 813.19,2584.35 813.19,2627.27 852.17,2627.27
  region: 1275.59,1019.69 1216.54,1019.69 1216.54,1074.8 1275.59,1074.8
  region: 692.91,2187.7 617.91,2187.7 617.91,2220.77 692.91,2220.77
  region: 926.77,2187.7 851.77,2187.7 851.77,2220.77 926.77,2220.77
  region: 987.02,3359.06 957.87,3359.06 957.87,3388.19 987.02,3388.19
  region: 926.77,1467.22 851.77,1467.22 851.77,1500.3 926.77,1500.3
  region: 1269.49,2174.41 1194.49,2174.41 1194.49,2207.48 1269.49,2207.48
  region: 1336.71,2281.5 1294.98,2281.5 1294.98,2382.28 1336.71,2382.28
  region: 1170.08,1757.67 1104.72,1757.67 1104.72,1786.83 1170.08,1786.83
  region: 2616.99,2727.16 2552.03,2727.16 2552.03,2865.35 2616.99,2865.35
  region: 2398.49,2727.16 2333.53,2727.16 2333.53,2865.35 2398.49,2865.35
  region: 3054.01,2727.16 2989.05,2727.16 2989.05,2865.35 3054.01,2865.35
  region: 2433.86,2727.16 2297.64,2727.16 2297.64,2755.14 2433.86,2755.14
  region: 2835.5,2727.16 2770.54,2727.16 2770.54,2865.35 2835.5,2865.35
  region: 3089.38,2727.16 2953.16,2727.16 2953.16,2755.14 3089.38,2755.14
  region: 2652.36,2727.16 2516.15,2727.16 2516.15,2755.14 2652.36,2755.14
  region: 2870.87,2727.16 2734.65,2727.16 2734.65,2755.14 2870.87,2755.14
  region: 2446.45,2477.36 2227.95,2477.36 2227.95,2875 2446.45,2875
  region: 3101.97,2477.36 2883.47,2477.36 2883.47,2875 3101.97,2875
  region: 2883.47,2477.36 2664.96,2477.36 2664.96,2875 2883.47,2875
  region: 2664.96,2477.36 2429.72,2477.36 2429.72,2875 2664.96,2875
  region: 3122.05,-177.17 1771.65,-177.17 1771.65,43.31 3122.05,43.31
In3.Cu (Sign):
  region: 1772.76,239.09 590.55,239.09 590.55,324.8 1772.76,324.8
  region: 3213.05,933.77 3213.05,880.21 3155.71,822.87 2924.71,822.87 2924.71,1031.01 2925.65,1031.95 3114.87,1031.95
  region: 2952.76,1110.85 2952.76,1013.78 2729.33,1013.78 2729.33,1139.27 2924.34,1139.27
  region: 3051.98,2053.86 3051.98,2010.56 3787.75,2010.56 3787.75,1707.41 2929.94,1707.41 2929.94,2073.55 3032.3,2073.55
  region: 3122.05,-177.17 1771.65,-177.17 1771.65,43.31 3122.05,43.31
  region: 2901.68,2066.93 2930.12,2066.93 2930.12,1397.64 2845.47,1397.64 2845.47,1322.83 2603.35,1322.83 2449.8,1476.38 2449.8,2000 2675.07,2000 2866.31,2113.27
  region: 3122.05,-177.17 1771.65,-177.17 1771.65,43.31 3122.05,43.31
In4.Cu (GND):
  region: 1772.76,239.09 589.53,239.09 589.53,366.16 1772.76,366.16
  region: 3122.05,-177.17 1771.65,-177.17 1771.65,43.31 3122.05,43.31
  region: 3122.05,-177.17 1771.65,-177.17 1771.65,43.31 3122.05,43.31
B.Cu:
  region: 1772.76,366.16 1772.76,239 589.53,239 589.53,366.16
  region: 1948.82,479.33 1906.5,437.01 1861.22,437.01 1861.22,493.11 1891.73,523.62 1948.82,523.62
  region: 3153.23,1289.67 3155.51,1287.39 3156.75,1284.41 3156.75,1281.18 3155.51,1278.2 3153.23,1275.92 3150.25,1274.68 3147.02,1274.68 3144.04,1275.92 3141.76,1278.2 3140.52,1281.18 3140.52,1284.41 3141.76,1287.39 3144.04,1289.67 3147.02,1290.91 3150.25,1290.91
  region: 2294.29,1946.85 2241.14,1946.85 2241.14,1964.37 2294.29,1964.37
  region: 2837.27,1383.01 2839.55,1380.73 2840.79,1377.75 2840.79,1374.52 2839.55,1371.54 2837.27,1369.26 2834.29,1368.02 2831.06,1368.02 2828.08,1369.26 2825.8,1371.54 2824.57,1374.52 2824.57,1377.75 2825.8,1380.73 2828.08,1383.01 2831.06,1384.25 2834.29,1384.25
  region: 1888.78,584.65 1851.38,584.65 1851.38,620.08 1888.78,620.08
  region: 3056.96,1193.49 3059.24,1191.21 3060.47,1188.23 3060.47,1185 3059.24,1182.02 3056.96,1179.74 3053.98,1178.5 3050.75,1178.5 3047.77,1179.74 3045.49,1182.02 3044.25,1185 3044.25,1188.23 3045.49,1191.21 3047.77,1193.49 3050.75,1194.73 3053.98,1194.73
  region: 2411.29,2078.73 2413.57,2076.45 2414.8,2073.46 2414.8,2070.24 2413.57,2067.26 2411.29,2064.97 2408.31,2063.74 2405.08,2063.74 2402.1,2064.97 2399.82,2067.26 2398.58,2070.24 2398.58,2073.46 2399.82,2076.45 2402.1,2078.73 2405.08,2079.96 2408.31,2079.96
  region: 1627.95,4.92 1312.99,4.92 1312.99,135.83 1627.95,135.83
Edge.Cuts:
  lines w1.97: 157.48,0 590.55,0 ; 157.48,0 157.48,3661.42 ; 157.48,0 590.55,0 ; 157.48,0 157.48,3661.42 ; 157.48,3661.42 4094.49,3660.48 4094.49,127.95 3193.9,127.95 ; 590.55,0 590.55,305.12 ; 590.55,0 590.55,305.12 ; 590.55,305.12 cw(c610.23,305.12) 610.24,324.8 ; 590.55,305.12 cw(c610.23,305.12) 610.24,324.8 ; 610.24,324.8 1293.31,324.8 ; 610.24,324.8 1293.31,324.8 ; 1293.31,324.8 cw(c1293.31,305.12) 1312.99,305.12 ; 1293.31,324.8 cw(c1293.31,305.12) 1312.99,305.12 ; 1312.99,0 1627.95,0 ; 1312.99,0 1312.99,305.12 ; 1312.99,0 1627.95,0 ; 1312.99,0 1312.99,305.12 ; 1627.95,0 1627.95,252.95 ; 1627.95,0 1627.95,252.95 ; 1627.95,252.95 cw(c1699.8,252.95) 1771.65,252.95 ; 1627.95,252.95 cw(c1699.8,252.95) 1771.65,252.95 ; 1771.65,-157.48 1791.34,-177.17 ; 1771.65,-157.48 1771.65,252.95 ; 1771.65,-157.48 1791.34,-177.17 ; 1771.65,-157.48 1771.65,252.95 ; 1791.34,-177.17 2192.91,-177.17 ; 1791.34,-177.17 2192.91,-177.17 ; 2192.91,-177.17 2212.6,-157.48 ; 2192.91,-177.17 2212.6,-157.48 ; 2212.6,-157.48 2212.6,116.14 ; 2212.6,-157.48 2212.6,116.14 ; 2212.6,116.14 cw(c2250,116.14) 2287.4,116.14 ; 2212.6,116.14 cw(c2250,116.14) 2287.4,116.14 ; 2287.4,-157.48 2307.09,-177.17 ; 2287.4,-157.48 2287.4,116.14 ; 2287.4,-157.48 2307.09,-177.17 ; 2287.4,-157.48 2287.4,116.14 ; 2307.09,-177.17 3102.36,-177.17 ; 2307.09,-177.17 3102.36,-177.17 ; 3102.36,-177.17 3122.05,-157.48 ; 3102.36,-177.17 3122.05,-157.48 ; 3122.05,-157.48 3122.05,56.1 ; 3122.05,-157.48 3122.05,56.1 ; 3122.05,56.1 cw(c3193.9,56.1) 3193.9,127.95 ; 3122.05,56.1 cw(c3193.9,56.1) 3193.9,127.95

## Other copper
F.Cu:
  region net GND: 617.7,2850.12 617.7,2956.42 677.85,2956.42 cw(c677.85,2951.27) 683,2951.27 683,2856.27 cw(c676.85,2856.27) 676.85,2850.12
  region net GND: 617.7,2043.03 617.7,2149.33 677.85,2149.33 cw(c677.85,2144.18) 683,2144.18 683,2049.18 cw(c676.85,2049.18) 676.85,2043.03
  region net GND: 617.7,1235.94 617.7,1342.24 677.85,1342.24 cw(c677.85,1337.09) 683,1337.09 683,1242.09 cw(c676.85,1242.09) 676.85,1235.94
  region net GND: 617.7,428.85 617.7,535.15 677.85,535.15 cw(c677.85,530) 683,530 683,435 cw(c676.85,435) 676.85,428.85
  region net -5V: 1494.45,856 1544.05,856 1544.05,811.41 1494.45,811.41
  region net -5V: 1493.44,3277.26 1544.05,3277.26 1544.05,3232.67 1493.44,3232.67
  region net -5V: 1494.45,2470.17 1544.05,2470.17 1544.05,2425.58 1494.45,2425.58
  region net -5V: 1494.17,1662.81 1543.78,1662.81 1543.78,1618.22 1494.17,1618.22
  pour cut-out: 584.59,1094.49 1701.77,1094.49 1701.77,405.51 585.08,405.51
  pour cut-out: 2957.55,2678.69 2981.68,2702.82 3061.62,2702.82 3085.64,2678.8 3085.64,2600.8 3059.64,2574.8 2981.55,2574.8 2957.55,2598.81
  pour cut-out: 2739.04,2678.69 2763.18,2702.82 2843.11,2702.82 2867.13,2678.8 2867.13,2600.8 2841.13,2574.8 2763.05,2574.8 2739.04,2598.81
  pour cut-out: 2520.54,2678.69 2544.67,2702.82 2624.6,2702.82 2648.62,2678.8 2648.62,2600.8 2622.62,2574.8 2544.54,2574.8 2520.54,2598.81
  pour cut-out: 2302.03,2678.69 2326.16,2702.82 2406.1,2702.82 2430.12,2678.8 2430.12,2600.8 2404.12,2574.8 2326.03,2574.8 2302.03,2598.81
  pour cut-out: 1776.57,3217.52 1776.57,3394.69 1953.74,3394.69 1953.74,3217.52
  pour cut-out: 1776.57,2410.43 1776.57,2587.6 1953.74,2587.6 1953.74,2410.43
  pour cut-out: 1776.57,1603.35 1776.57,1780.51 1953.74,1780.51 1953.74,1603.35
  pour cut-out: 1776.57,796.26 1776.57,973.43 1953.74,973.43 1953.74,796.26
  pour cut-out: 1771.65,43.31 3122.05,43.31 3122.05,-177.17 1771.65,-177.17
  pour cut-out: 584.59,1901.57 1701.77,1901.57 1701.77,1212.6 585.08,1212.6
  pour cut-out: 584.59,2708.66 1701.77,2708.66 1701.77,2019.69 585.08,2019.69
  pour cut-out: 584.59,3516.12 1701.77,3516.12 1701.77,2826.77 585.08,2826.77